# Altium PCB POD-Design-v1.0.PcbDoc (part 8 of 8)
Units mil, origin at the board's own origin, x right, y up, seen from the top; angles counter-clockwise.
Board outline 5511.81 x 3937.01 mil, 4 copper layers (Top Layer, Layer 1, Layer 2, Bottom Layer), stack 61.653 mil thick; 347 components, 252 nets, 1015 pads, 412 vias.
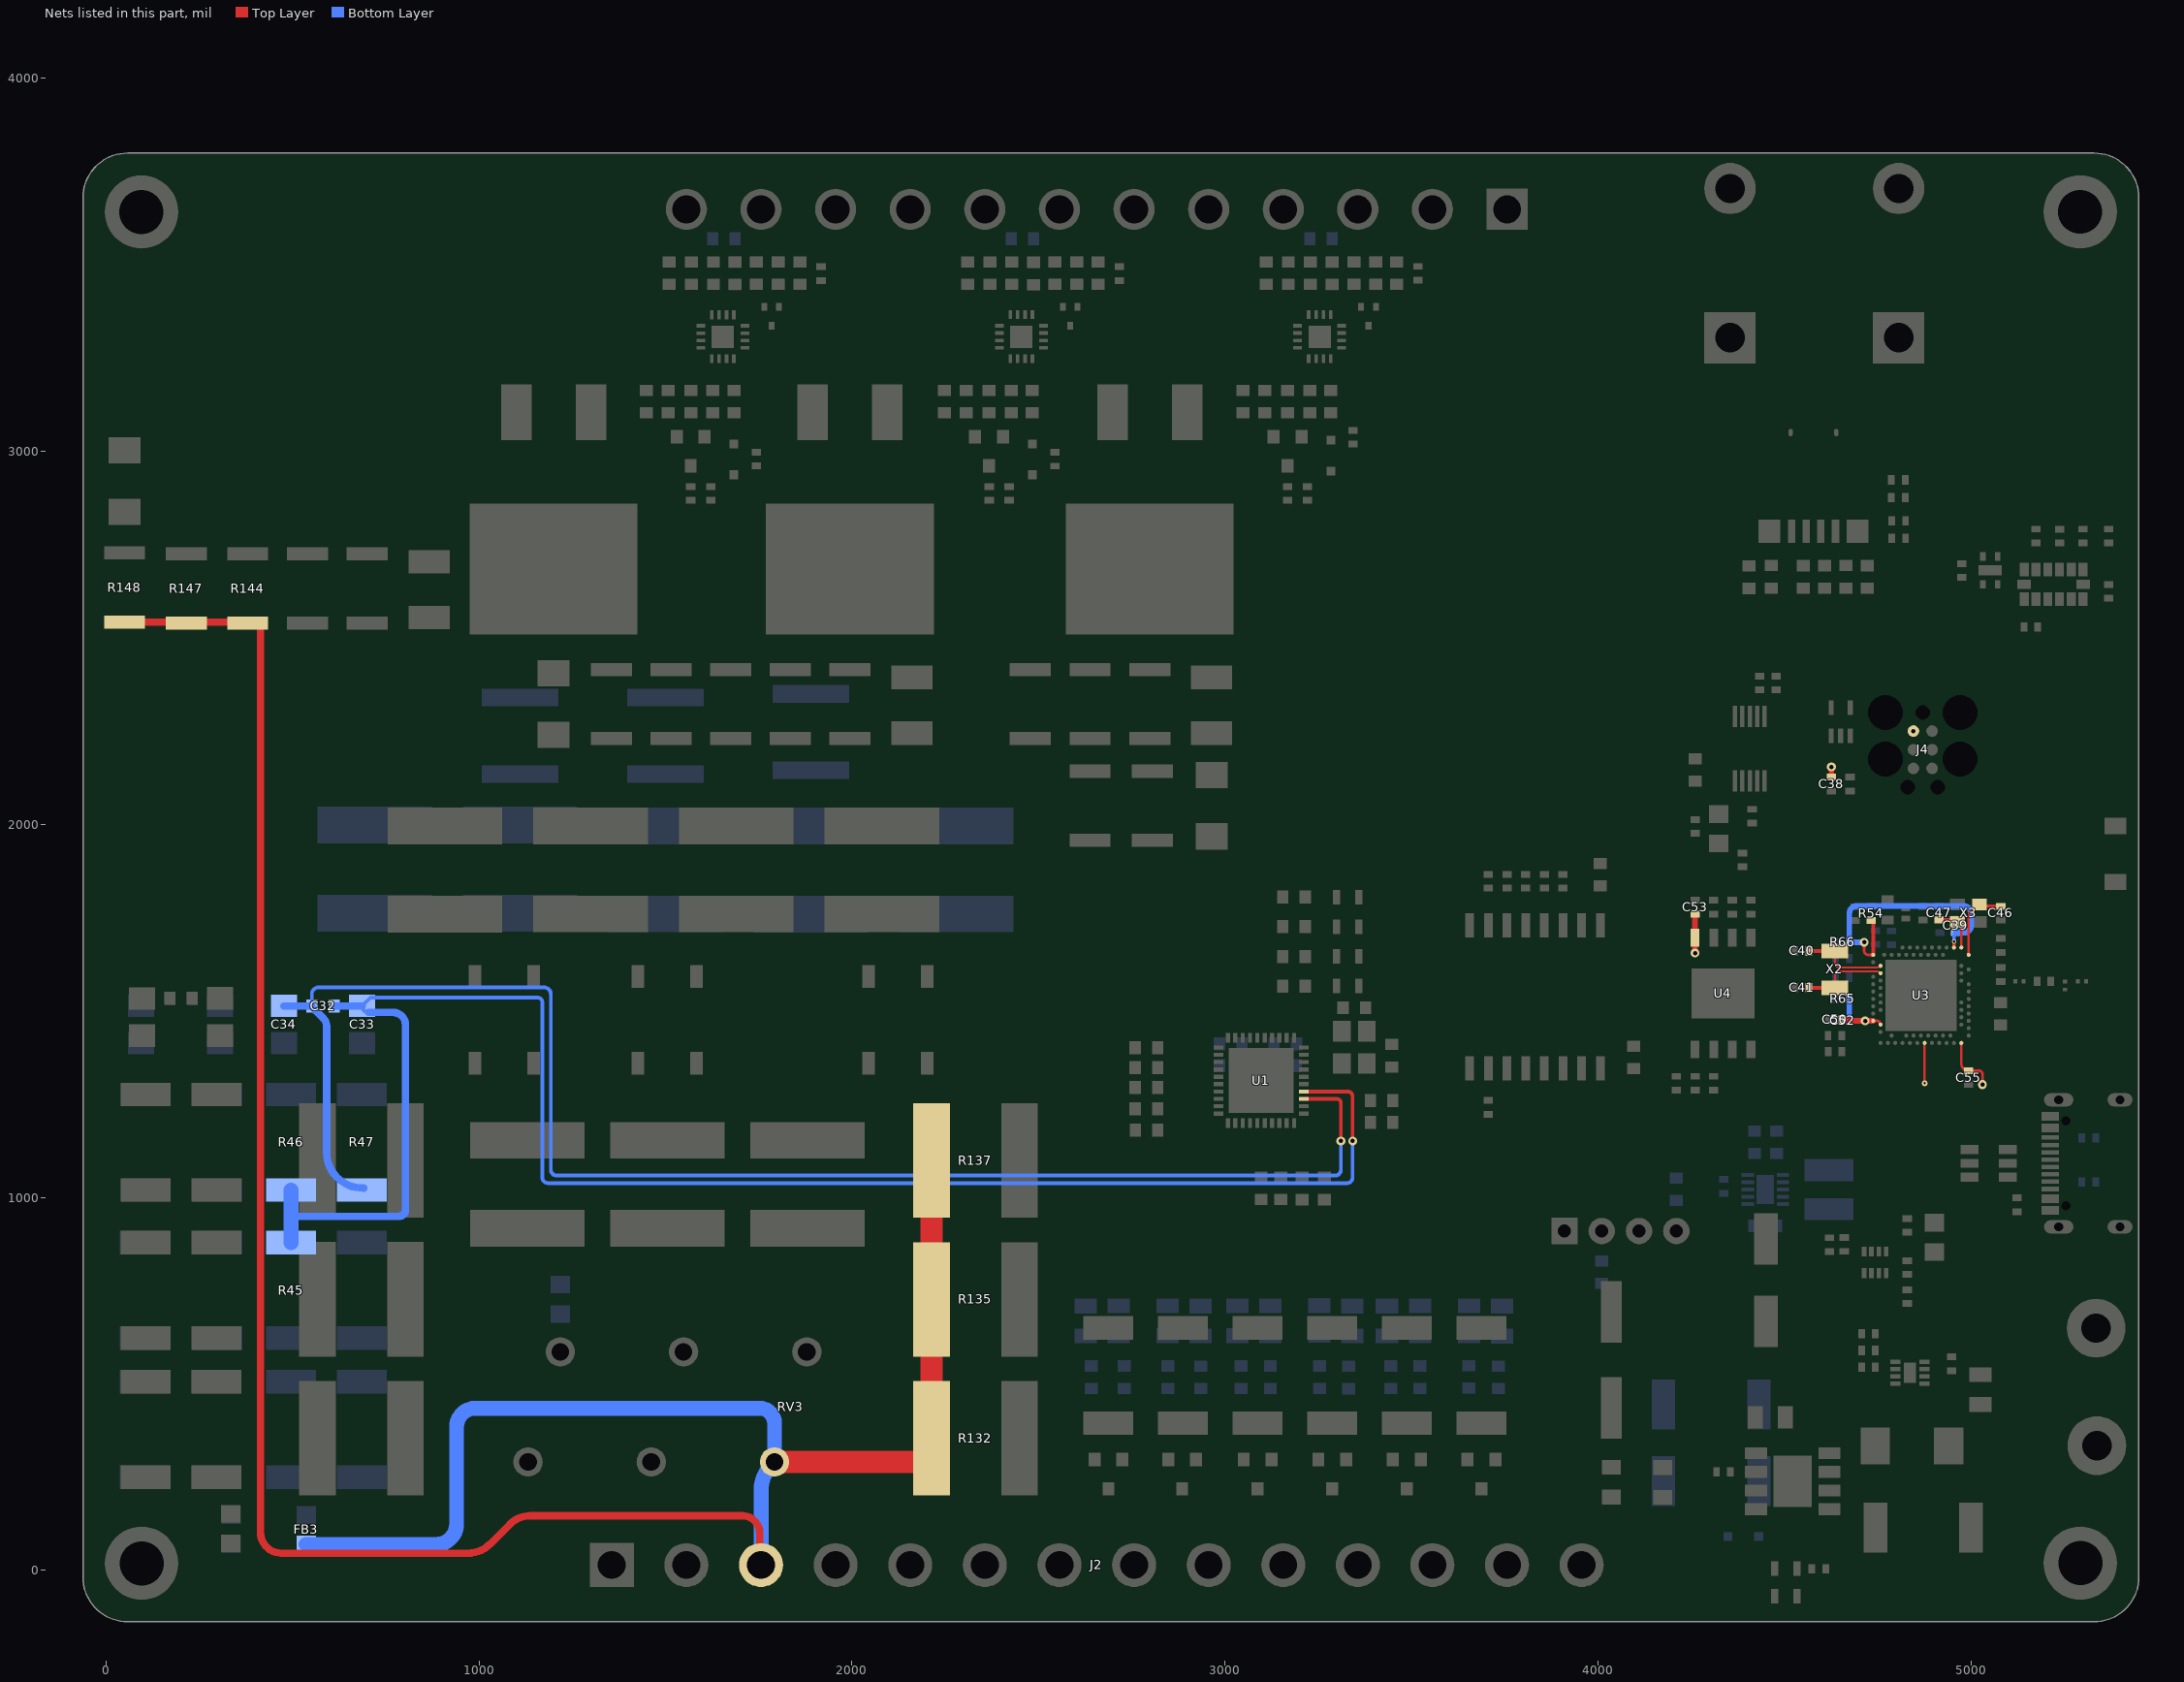
[diagram p6: the nets of this part, all layers, seen from the top]

## Via types
v1: diameter 23.62, hole 11.81, Top Layer to Bottom Layer, tented both sides, 381 vias
v2: diameter 11.81, hole 5.91, Top Layer to Bottom Layer, tented both sides, 30 vias
v3: diameter 15.75, hole 5.91, Top Layer to Bottom Layer, tented both sides, 1 vias

## Nets (pads, with @x,y where several pads share a name; then routed paths per layer and width w, separated by ;. In a path a pad name is that pad's centre, name@x,y a point inside that pad or via, vN(x,y) a via of type N, cw(c..) or ccw(c..) an arc to the next point about the centre after c; other vN are vias at no path point) (continued)
VC_INPUT: FB3.1 J2.3 R132.1 R135.1 R137.1 R144.1 R147.1 R148.1 RV3.2 | length 7535.1
  Top Layer w20: R148.1@50,2542.48 377.44,2542.48 cw(c377.44,2539.92) R144.1@380,2539.92 401.54,2539.92 414.26,2527.21 414.26,102.74 ccw(c470.53,102.74) 470.53,46.46 970.33,46.46 970.39,46.46 ccw(c970.39,130.56) 1029.86,71.09 1083.08,124.31 cw(c1137.7,69.69) 1137.7,146.93 1705.97,146.93 cw(c1705.97,100.06) 1752.84,100.06 1752.84,18.08 ccw(c1756.1,18.08) J2.3@1756.1,14.82
  Top Layer w60: RV3.2@1792.21,291 2209,291 R132.1@2220,280 ; R132.1@2194.81,310.06 ccw(c2194.81,328.14) 2212.89,328.14 R132.1@2212.89,354.39 R135.1@2212.89,726.63 R137.1@2212.89,1098.87
  Bottom Layer w40: FB3.1@536.52,70.08 885.08,70.08 ccw(c885.08,125) 940,125 940,385.08 cw(c989.53,385.08) 989.53,434.61 1752.87,434.61 cw(c1752.87,395.27) 1792.21,395.27 RV3.2@1792.21,291 1785.39,284.18 ccw(c1856.1,213.47) 1756.1,213.47 J2.3@1756.1,14.82
VC_N: C32.2 C34.2 R47.2 U1.23 | length 4220.5
  Top Layer w10: U1.23@3210.97,1264.29 3299.89,1264.29 cw(c3299.89,1253.55) 3310.63,1253.55 v1(3310.63,1151.65)
  Bottom Layer w10: C32.2@562.07,1500.82 562.07,1503.38 C32.2@552.07,1513.38 552.07,1545.39 cw(c569.84,1545.39) 569.84,1563.16 1174.17,1563.16 cw(c1174.17,1544.77) 1192.57,1544.77 1192.57,1074.43 ccw(c1207.99,1074.43) 1207.99,1059.01 3295.79,1059.01 ccw(c3295.79,1073.85) 3310.63,1073.85 v1(3310.63,1151.65) ; 582.88,1480.01 582.95,1479.93 ; 591.52,1459.16 591.52,1459.24
  Bottom Layer w20: C34.2@477.07,1513.38 C32.2@552.07,1513.38 ; C32.2@562.07,1500.82 582.88,1480.01 ; 582.95,1479.93 cw(c562.19,1459.22) 591.52,1459.24 ; 591.52,1459.16 591.52,1121.33 ccw(c687.53,1121.33) R47.2@690.77,1025.38
VC_P: C32.1 C33.2 R45.2 R46.2 U1.24 | length 4686.8
  Top Layer w10: U1.24@3210.97,1283.97 3328.7,1283.97 cw(c3328.7,1270.73) 3341.95,1270.73 v1(3341.95,1151.65)
  Bottom Layer w10: C33.2@704.57,1495.88 cw(c704.57,1513.38) C33.2@687.07,1513.38 709.48,1535.8 1156.59,1535.8 cw(c1156.59,1522.45) 1169.94,1522.45 1169.94,1053.62 ccw(c1185.07,1053.62) 1185.07,1038.49 3327.01,1038.49 ccw(c3327.01,1053.43) 3341.95,1053.43 v1(3341.95,1151.65)
  Bottom Layer w20: 496.52,949.5 786.02,949.5 ccw(c786.02,966.3) 802.82,966.3 802.82,1463.06 ccw(c770,1463.06) 770,1495.88 C33.2@704.57,1495.88 ; C32.1@612.07,1513.38 C33.2@687.07,1513.38
  Bottom Layer w40: R45.2@496.52,878.96 496.52,949.5 R46.2@496.52,1020.04
VDD-nRF: C38.2 C39.2 C50.2 C52.2 C53.2 C55.2 J4.1 R54.2 R65.1 R66.1 U3.A22 U3.AD14 U3.AD23 U3.B1 U3.W1 U3.Y2 U4.8 | length 1343.9
  Top Layer w7: C50.2@4653.5,1477.07 ccw(c4657.33,1477.07) C50.2@4657.33,1473.24 ; v1(4713.43,1684.2) 4713.43,1661.1 ccw(c4724.12,1661.1) 4724.12,1650.41 U3.B1@4737.66,1650.41 ; U3.W1@4737.76,1473.35 4747.4,1473.35 cw(c4747.4,1463.4) U3.Y2@4757.35,1463.4 ; v3(4875.46,1306.37) U3.AD14@4875.46,1414.19 ; U3.AD23@4973.88,1414.19 4973.88,1358.62 ccw(c4993,1358.62) C55.2@4993,1339.5 5021.47,1339.5 cw(c5021.47,1330) 5030.97,1330 5030.97,1302.5 v1(5030.84,1302.5)
  Top Layer w10: U3.B1@4737.66,1650.41 R54.2@4737.66,1742.82 ; U3.A22@4954.2,1670.09 v2(4954.2,1686.01)
  Top Layer w15: v1(4260,1655) U4.8@4259.99,1696.16 C53.2@4260,1759.64 ; C38.2@4625.62,2126.62 v1(4625.62,2154.25) ; C50.2@4657.33,1473.24 v1@4716.22,1473.24 ; v1(4716.22,1473.35) U3.W1@4737.56,1473.35
  Bottom Layer w7: C52.2@4673.72,1473.35 C52.2@4673.72,1473.88
  Bottom Layer w10: v2(4954.2,1686.01) C39.2@4954.2,1706.27
  Bottom Layer w15: C52.2@4673.72,1473.35 v1(4716.22,1473.35) ; C52.2@4673.72,1473.88 R65.1@4673.72,1532.3 ; v1(4713.43,1684.2) R66.1@4673.72,1684.2 4673.72,1761.42 cw(c4693.73,1761.42) 4693.73,1781.43 4980.5,1781.43 cw(c4980.5,1761.62) 5000.3,1761.62 5000.3,1728.61 cw(c4981.74,1728.61) 4981.74,1710.05 C39.2@4957.97,1710.05
  other v1: 4845.61,2250.13
XC1: C46.2 U3.B24 X3.1 | length 201.5
  Top Layer w6: U3.B24@4993.57,1650.41 4993.57,1755.21 cw(c5006.94,1755.21) 4997.11,1764.27 cw(c5006.94,1755.21) 4997.48,1764.66 5018.59,1785.75 X3.1@5022.52,1785.75
  Top Layer w10: X3.1@5027.16,1780.63 C46.2@5079.63,1780.63
XC2: C47.2 U3.A23 X3.3 | length 133.4
  Top Layer w6: X3.3@4963.47,1743.63 X3.3@4963.47,1738.5 4973.88,1738.5 U3.A23@4973.88,1670.09
  Top Layer w10: C47.2@4914,1743.63 X3.3@4963.47,1743.63
XL1: C40.2 U3.D2 X2.1 | length 231.7
  Top Layer w5: 4635,1628.32 ccw(c4646.66,1628.32) 4646.69,1616.66 4747.15,1616.66 ccw(c4747.15,1631.08) U3.D2@4757.35,1620.88 ; 4635,1628.35 X2.1@4635,1659.94
  Top Layer w10: C40.2@4565,1660.57 X2.1@4635,1660.57
XL2: C41.2 U3.F2 X2.2 | length 232.3
  Top Layer w5: X2.2@4635,1562.14 4635,1593.24 cw(c4648.13,1593.24) 4648.13,1606.37 4744.86,1606.37 cw(c4744.86,1588.71) 4754.14,1603.74 cw(c4744.86,1588.71) U3.F2@4757.35,1601.2
  Top Layer w10: C41.2@4565,1562.14 X2.2@4635,1562.14
pads on no net: ANT1.2 D8.3 J1.A8 J1.B8 J1.MH J2.5 J2.12 J4.MP1 J4.MP2 J4.MP3 J4.MP4 J4.MP5 J4.MP6 J4.MP7 U1.33 U1.34 U3.A8 U3.A10 U3.A12 U3.A14 U3.A20 U3.AB2 U3.AC9 U3.AC11 U3.AC21 U3.AD8 U3.AD10 U3.AD20 U3.B9 U3.B11 U3.B13 U3.B19 U3.J24 U3.L24 U3.P23 U3.U1 U12.3 U12.9 U12.10 U12.11

## Polygon pours and split planes (outlines as drawn)
GND on Layer 1 "NONET_L-01_P-001" (solid, pour order 0): 3605,2174 ccw(c3505,2174) 3505,2274 -61.81,2274 -61.81,2430 -61.81,3699.57 cw(c38.19,3699.57) 38.19,3799.57 5330,3799.57 cw(c5330,3679.58) 5450,3679.57 5450,-17.43 cw(c5330,-17.44) 5330,-137.43 4466.86,-137.43 4362.93,-137.45 4362.93,1479.64 ccw(c4299.84,1479.64) 4299.84,1542.73 3673.41,1542.73 cw(c3673.41,1611.14) 3605,1611.14
NGND on Layer 1 "NONET_L-01_P-001" (solid, pour order 26): 3478,1476 ccw(c3526,1476) 3526,1428 4132.69,1428 cw(c4133.7,1372.7) 4189,1373.72 4189,-137.43 188.65,-137.43 38.19,-137.43 cw(c38.19,-37.43) -61.81,-37.43 -61.81,1995 3400,1995 cw(c3400,1917) 3478,1917
GND on Top Layer "NONET_L-01_P-001" (solid, remove dead copper, pour order 43): 3677,1820 3497,1820 3497,1542.73 4299.84,1542.73 cw(c4299.84,1479.64) 4362.93,1479.64 4362.93,-137.45 4466.86,-137.43 5330,-137.43 ccw(c5330,-17.44) 5450,-17.43 5450,3679.57 ccw(c5330,3679.58) 5330,3799.57 2694.09,3799.57 975,3799.57 975,2894.42 3389.14,2894.42 ccw(c3389.14,2977.68) 3472.41,2977.68 3472.41,3357.41 cw(c3544.87,3357.41) 3544.87,3429.87 3613.13,3429.87 cw(c3613.13,3366) 3677,3366
DC_CUR_POS on Top Layer "NONET_L-01_P-001" (solid, pour order 1): 4235,3010 ccw(c4267.32,3010) 4267.32,2977.68 4510.79,2977.68 ccw(c4510.79,2995) 4528.11,2995 4528.11,3740.3 ccw(c4490.14,3740.3) 4490.14,3778.27 4273.27,3778.27 ccw(c4273.27,3740) 4235,3740
3V3 on Top Layer "NONET_L-01_P-001" (solid, pour order 16): 4381,2860.38 cw(c4393.55,2860.38) 4393.55,2872.93 4476.69,2872.93 cw(c4476.69,2860.62) 4489.01,2860.62 4489.01,2688.2 cw(c4474.03,2688.19) 4474.03,2673.22 4393.7,2673.22 cw(c4393.7,2685.92) 4381,2685.92
VBAT on Top Layer "NONET_L-01_P-001" (solid, pour order 6): 4910,470 ccw(c4910,445) 4885,445 4885,70 ccw(c4913.27,70) 4913.28,41.72 5028.14,41.72 ccw(c5028.14,73.59) 5060,73.59 5060,208.66 cw(c5086.33,208.66) 5086.34,235 5397.67,235 ccw(c5397.67,260.22) 5422.89,260.22 5422.89,447.11 ccw(c5400,447.11) 5400,470
NetR74_1 on Top Layer "NONET_L-01_P-001" (solid, pour order 4): 4590.71,230.2 4806.8,230.2 cw(c4806.8,212) 4825,212 4825,51.88 cw(c4814.84,51.88) 4814.84,41.72 4694.57,41.72 cw(c4694.57,51.29) 4685,51.29 4685,186.45 ccw(c4672.82,186.45) 4672.82,198.62 4590.71,198.62
DC_CUR_NEG on Top Layer "NONET_L-01_P-001" (solid, pour order 2): 4687,3145.35 cw(c4665,3145.35) 4665,3123.35 ccw(c4665,3095) 4636.65,3095 4636.65,3005.1 ccw(c4664.07,3005.1) 4664.07,2977.68 4841.05,2977.68 4962.79,2977.68 ccw(c4962.79,2995) 4980.11,2995 4980.11,3740.3 ccw(c4942.14,3740.3) 4942.14,3778.27 4725.27,3778.27 ccw(c4725.27,3740) 4687,3740
NGND on Layer 2 "NONET_L-01_P-001" (solid, remove dead copper, pour order 41): 626,1995 626,1892.93 ccw(c726,1892.93) 726,1792.93 2132.92,1792.93 ccw(c2132.92,1832.61) 2172.6,1832.61 2172.6,1995 2491,1995 cw(c2490,1928.73) 2556.27,1927.73 2556.27,1100.12 ccw(c2638.22,1100.12) 2638.22,1018.17 3765.27,1018.17 cw(c3765.27,947.44) 3836,947.44 3836,-137.43 3714.35,-137.43 188.65,-137.43 38.19,-137.43 cw(c38.19,-37.44) -61.81,-37.43 -61.81,1995
GND on Layer 2 "NONET_L-01_P-001" (solid, remove dead copper, pour order 40): 4362.93,1148.04 4652.04,1148.04 4652.04,500.78 4473.7,500.78 4473.7,-34.28 4289.81,-34.28 4289.81,-137.45 4362.93,-137.45 4466.86,-137.43 5330,-137.43 ccw(c5330,-17.44) 5450,-17.43 5450,3679.57 ccw(c5330,3679.58) 5330,3799.57 38.19,3799.57 ccw(c38.19,3699.57) -61.81,3699.57 -61.81,2430 -61.81,2274 3505,2274 cw(c3505,2174) 3605,2174 3605,1542.73 4299.84,1542.73 cw(c4299.84,1479.64) 4362.93,1479.64
VBUS on Layer 2 "NONET_L-01_P-001" (solid, pour order 29): 4453.31,480.39 4289.81,480.39 4289.81,6.08 ccw(c4331.14,7.15) 4332.21,-34.17 5050.67,-34.17 ccw(c5050.67,21.16) 5106,21.16 5106,863.91 ccw(c5065.91,863.91) 5065.91,904 4795,904 ccw(c4795,868.15) 4759.15,868.15 4759.15,754.85 ccw(c4788,754.85) 4788,726 4869,726 cw(c4869,705.15) 4889.85,705.15 4889.85,212.86 cw(c4828.98,212.86) 4828.98,152 4489.24,152 cw(c4489.09,187.78) 4453.31,187.85
3V3 on Layer 2 "NONET_L-01_P-001" (solid, pour order 25): 4602.35,1127.65 cw(c4602.35,1084) 4646,1084 4646,628.73 ccw(c4663.23,628.73) 4663.23,611.5 4724.36,611.5 cw(c4724.36,592.49) 4743.38,592.49 4743.38,522.11 cw(c4722.05,522.11) 4722.04,500.78 3991.91,500.78 cw(c3991.91,527.25) 3965.43,527.25 3965.43,935.05 cw(c3993.38,935.05) 3993.38,963 4034.65,963 cw(c4034.65,944.1) 4053.55,944.1 4053.55,834.51 ccw(c4074.57,834.51) 4074.57,813.48 4327.48,813.48 ccw(c4327.48,831) 4345,831 4345,1105.55 cw(c4367.1,1105.55) 4367.1,1127.65
3V3-IS on Layer 2 "NONET_L-01_P-001" (solid, pour order 23): 2715,1740 ccw(c2715,1695) 2670,1695 2670,1165.17 ccw(c2724.17,1165.17) 2724.17,1111 4143.93,1111 cw(c4143.93,1080.36) 4174.57,1080.36 4174.57,869.78 ccw(c4195.43,869.78) 4195.43,848.92 4301.09,848.92 ccw(c4301.09,867.83) 4320,867.83 4320,1349.04 ccw(c4285.09,1349.04) 4285.09,1383.95 3140.66,1383.95 cw(c3140.66,1411.9) 3112.71,1411.9 3112.71,1476.31 cw(c3135.95,1476.31) 3135.95,1499.55 3162.76,1499.55 ccw(c3162.76,1521.99) 3185.19,1521.99 3185.19,1700 ccw(c3145.19,1700) 3145.19,1740
VDD-nRF on Layer 2 "NONET_L-01_P-001" (solid, remove dead copper, pour order 22): 4656.01,1634.87 cw(c4656.01,1604.66) 4686.22,1604.66 4686.22,1333.66 ccw(c4731.74,1333.66) 4731.74,1288.14 4914.83,1290 5060,1290 ccw(c5060,1327.46) 5097.46,1327.46 5097.46,2399.93 ccw(c5052.39,2399.93) 5052.39,2445 4160,2445 ccw(c4160,2380) 4095,2380 4095,1687.87 ccw(c4148,1687.87) 4148,1634.87
VBUS-TYPEC on Layer 2 "NONET_L-01_P-001" (solid, pour order 21): 5159.95,1246 cw(c5160.04,1217.17) 5188.87,1217.17 5188.87,961.43 cw(c5161.2,961.43) 5161.2,933.76 4884.24,933.76 cw(c4884.24,952) 4866,952 4866,1224 cw(c4888,1224) 4888,1246
GND on Bottom Layer "NONET_L-01_P-001" (solid, remove dead copper, pour order 42): 3001.47,3272 cw(c3001.47,3172) 3101.47,3172 3101.47,2891 3605,2891 3605,1611.14 ccw(c3673.41,1611.14) 3673.41,1542.73 4299.84,1542.73 cw(c4299.84,1479.64) 4362.93,1479.64 4362.93,-137.45 4466.86,-137.43 5330,-137.43 ccw(c5330,-17.44) 5450,-17.43 5450,3679.57 ccw(c5330,3679.58) 5330,3799.57 2684.09,3799.57 1180,3799.57 1180,3272
NetC91_2 on Bottom Layer "NONET_L-01_P-001" (solid, pour order 34): 1346.46,2135.46 cw(c1383,2135.46) 1383,2172 1613,2172 cw(c1613,2131.46) 1653.54,2131.46 1653.54,1946.17 cw(c1622,1946.17) 1622,1914.63 1378.83,1914.63 cw(c1378.83,1947.01) 1346.46,1947.01
GND on Bottom Layer "NONET_L-01_P-001" (solid, pour order 31): 4175.57,307 4284.22,307 cw(c4284.22,291.22) 4300,291.22 4300,130.25 ccw(c4310.25,130.25) 4310.25,120 4368.51,120 cw(c4368.51,103.03) 4385.47,103.03 4385.47,71.53 ccw(c4412,71.53) 4412,45 4461,45 ccw(c4461,62) 4478,62 4478,303 cw(c4499,303) 4499,324 4574.53,324 cw(c4574.53,298.62) 4599.91,298.62 4599.91,21.78 cw(c4567.12,21.78) 4567.12,-11 4136,-11 cw(c4136,6) 4119,6 4119,287.3 cw(c4138.69,287.3) 4138.7,307
VBAT on Bottom Layer "NONET_L-01_P-001" (solid, pour order 27): 4723.86,1006.85 ccw(c4723.86,991.78) 4708.79,991.78 4708.79,542.9 ccw(c4728.54,542.9) 4728.54,523.15 5064.35,523.15 cw(c5064.35,495.5) 5092,495.5 5092,257.11 ccw(c5127.77,257.11) 5127.77,221.34 5402.36,221.34 ccw(c5402.36,251.39) 5432.4,251.39 5432.4,465.1 ccw(c5400,465.1) 5400,497.5 5261,497.5 cw(c5261,529) 5229.5,529 5229.5,725.5 ccw(c5208.5,725.5) 5208.5,746.5 5007.5,746.5 4806.5,746.5 cw(c4806.5,765) 4788,765 4788,990.5 ccw(c4771.65,990.5) 4771.65,1006.85
3V3 on Bottom Layer "NONET_L-01_P-001" (solid, pour order 24): 5338.21,2870 cw(c5338.21,2852.28) 5355.93,2852.28 5355.93,2600.6 cw(c5336.4,2600.6) 5336.4,2581.07 4526.03,2581.07 ccw(c4526.03,2535.04) 4480,2535.04 4480,2123.54 cw(c4446.46,2123.54) 4446.46,2090 4088,2090 ccw(c4087.99,2056.02) 4054.01,2056.01 4054.01,830 cw(c4030.15,830) 4030.15,806.14 3990.51,806.14 cw(c3990.51,831.21) 3965.43,831.22 3965.43,1774.57 ccw(c3914.01,1774.57) 3914.01,1825.99 3100,1825.99 3100,2870

## Other copper
Top Layer:
  rectangle net GND: 4814.42,2794.43 4867.18,2900.92
  rectangle net 3V3-IS: 4005.93,1332.5 4095,1357.51
  rectangle net VBUS: 4345.64,298.62 4453.31,330.2
  rectangle net GND: 4522.01,248.62 4649.96,280.2
  rectangle net NetR74_1: 4590.71,198.62 4743.38,230.2
  rectangle net NetL7_1: 4590.71,298.62 4686.37,330.2
  rectangle net DC_CUR_POS: 4427.15,3034.77 4528.11,3178.7
  rectangle net GND: 1619.57,3272.59 1688.46,3341.48
  rectangle net GND: 2419.57,3272.59 2488.46,3341.48
  rectangle net GND: 3219.57,3272.59 3288.46,3341.48
  pour cut-out: 4828.39,2150.13 ccw(c4845.61,2150.13) 4845.61,2132.91 ccw(c4845.61,2150.13) 4862.84,2150.13 ccw(c4845.61,2150.13) 4845.61,2167.35 ccw(c4845.61,2150.13)
  pour cut-out: 4811.61,984 ccw(c4828.83,984) 4828.83,966.78 ccw(c4828.83,984) 4846.05,984 ccw(c4828.83,984) 4828.83,1001.22 ccw(c4828.83,984)
  pour cut-out: 5140.78,1218.5 ccw(c5158,1218.5) 5158,1201.27 ccw(c5158,1218.5) 5175.22,1218.5 ccw(c5158,1218.5) 5158,1235.72 ccw(c5158,1218.5)
  pour cut-out: 4658.78,545.15 ccw(c4676,545.15) 4676,527.93 ccw(c4676,545.15) 4693.22,545.15 ccw(c4676,545.15) 4676,562.37 ccw(c4676,545.15)
  region net VBAT: 4957.73,546.05 cw(c4957.72,536.27) 4967.5,536.26 4967.5,478.65 ccw(c4976.3,478.65) 4976.3,469.85 4990.15,469.85 cw(c4990.15,465) 4995,465 4995,449.5 cw(c4990.5,449.5) 4990.5,445 4885,445 4885,458.11 cw(c4897.28,458.12) 4897.28,470.39 4924.39,470.39 ccw(c4924.39,477.05) 4931.06,477.06 4931.06,494.16 4931.06,508.67 ccw(c4925.17,508.68) 4925.17,514.56 4861.22,514.56 4861.22,546.05
  region net 3V3: 4331.8,1972.44 4384.4,1972.44 ccw(c4384.4,1980.96) 4392.93,1980.96 4392.93,2005.09 cw(c4400.52,2005.09) 4400.52,2012.69 4720.56,2012.69 cw(c4720.56,1989.09) 4744.16,1989.09 4744.16,1770.82 4719.16,1770.82 4719.16,1973.17 ccw(c4707.14,1973.17) 4707.14,1985.19 4434.49,1985.19 ccw(c4434.49,1977.09) 4426.39,1977.09 4426.39,1928.78 cw(c4412.61,1928.78) 4412.61,1915 4139.56,1915 ccw(c4139.56,1895.44) 4120,1895.44 4120,1716.16 cw(c4100,1716.16) 4100,1696.16 3994.85,1696.16 cw(c3994.85,1696.89) 3994.12,1696.89 cw(c3994.12,1706.08) 3984.93,1706.08 3984.93,1847.42 cw(c4002.95,1847.42) 4002.95,1865.44 4055.25,1865.44 ccw(c4055.25,1880.44) 4070.25,1880.44 4070.25,1919.97 cw(c4090.28,1919.97) 4090.28,1940 4280.01,1940 ccw(c4279.68,1946.01) 4285.68,1946.34 4285.68,1965.64 cw(c4292.48,1965.64) 4292.48,1972.44
  region net VB_INPUT: 1415,398.28 ccw(c1448.28,398.28) 1448.28,365 1519.02,365 cw(c1519.7,329.7) 1555,330.37 1555,280 cw(c1520,280) 1520,245 1340.47,245 cw(c1340.47,256.9) 1328.57,256.9 1328.57,812 ccw(c1302.87,812) 1302.87,837.7 1006.47,837.7 cw(c1006.47,867.73) 976.44,867.73 976.44,971.26 cw(c1005.29,971.26) 1005.29,1000.11 1999.9,1000.11 cw(c1999.9,966.16) 2033.86,966.16 2033.86,867 cw(c2004.69,867) 2004.69,837.83 1445.69,837.83 ccw(c1445.69,807.14) 1415,807.14
  region net NetBR2_4: 1715,1250.04 ccw(c1738.63,1250.04) 1738.63,1226.41 2003.82,1226.41 cw(c2003.82,1196.38) 2033.86,1196.38 2033.86,1092.86 cw(c2005,1092.86) 2005,1064 1010.39,1064 cw(c1010.39,1097.95) 976.44,1097.95 976.44,1197.11 cw(c1005.61,1197.11) 1005.61,1226.28 1532.28,1226.28 ccw(c1532.28,1254) 1560,1254 1560,1387.21 cw(c1586.79,1387.21) 1586.79,1414 1690.17,1414 cw(c1690.17,1389.18) 1715,1389.17
  region net NEUTRAL: 1115,1397.39 cw(c1137.61,1397.39) 1137.61,1420 1434.93,1420 cw(c1434.93,1394.93) 1460,1394.93 1460,1344.75 cw(c1435.26,1344.74) 1435.25,1320 1139.11,1320 cw(c1139.11,1344.11) 1115,1344.11
  region net NetC91_2: 1838.99,2095.33 cw(c1838.99,2061.5) 1872.82,2061.5 1872.82,1947.01 1453.37,1947.01 1145.67,1947.01 1145.67,2063.33 cw(c1177.67,2063.33) 1177.67,2095.33
  region net NetC100_2: 2234.15,1947.01 1926.46,1947.01 1926.46,2063.33 cw(c1958.46,2063.33) 1958.46,2095.33 2206,2095.33 cw(c2206,2067.18) 2234.15,2067.18
  region net NetC82_2: 1062.97,1946.73 755.28,1946.73 755.28,2063.05 cw(c787.28,2063.05) 787.28,2095.05 1034.82,2095.05 cw(c1034.82,2066.9) 1062.97,2066.9
  region net NetBR2_1: 1838.99,1859.11 cw(c1838.99,1825.28) 1872.82,1825.28 1872.82,1710.79 1453.37,1710.79 1145.67,1710.79 1145.67,1827.11 cw(c1177.67,1827.11) 1177.67,1859.11
  region net NetBR3_1: 2234.15,1710.79 1926.46,1710.79 1926.46,1827.11 cw(c1958.46,1827.11) 1958.46,1859.11 2206,1859.11 cw(c2206,1830.96) 2234.15,1830.96
  region net NetBR1_1: 1062.97,1710.51 755.28,1710.51 755.28,1826.83 cw(c787.28,1826.83) 787.28,1858.83 1034.82,1858.83 cw(c1034.82,1830.68) 1062.97,1830.68
  region net NetC82_2: 3116.56,3292.39 cw(c3116.56,3299.89) 3109.05,3299.89 3109.05,3316.22 cw(c3114.75,3316.22) 3114.75,3321.92 3160.37,3321.92 3207.11,3321.92 3207.11,3292.39
  region net NetC91_2: 2316.56,3292.39 cw(c2316.56,3299.89) 2309.05,3299.89 2309.05,3316.22 cw(c2314.75,3316.22) 2314.75,3321.92 2360.37,3321.92 2407.11,3321.92 2407.11,3292.39
  region net GND: 4408.42,813.05 4408.42,1049.37 cw(c4423.44,1049.37) 4423.44,1064.39 4495.07,1064.39 cw(c4495.07,1048.47) 4510.99,1048.47 4510.99,811.28 cw(c4497.01,811.28) 4497.01,797.3 4424.17,797.3 cw(c4424.17,813.05)
  region net VBAT: 4759.15,841.98 4759.15,940.14 ccw(c4746.55,940.14) 4746.55,952.74 4705.74,952.74 ccw(c4705.74,941) 4694,941 4694,897.59 ccw(c4707.18,897.59) 4707.18,884.41 4734.47,884.41 cw(c4734.47,872.34) 4746.55,872.34 4746.55,841.98
  region net V-OR: 4726.87,868.36 4726.87,764.22 cw(c4715.38,764.22) 4715.38,752.74 4434.44,752.74 ccw(c4434.44,736.72) 4418.42,736.72 4418.42,596.58 ccw(c4434,596.58) 4434,581 4535.08,581 ccw(c4535.08,598.92) 4553,598.92 4553,669.09 cw(c4569.91,669.09) 4569.91,686 4725,686 ccw(c4725,700.46) 4739.46,700.46 4739.46,868.36
  region net VBUS: 4746.55,827.05 cw(c4752.95,827.05) 4752.95,833.45 4760.83,833.45 ccw(c4760.83,838.85) 4766.24,838.85 4766.24,907.13 cw(c4775.27,907.13) 4775.27,916.17 4843.53,916.16 cw(c4843.53,907.29) 4852.41,907.29 4852.41,884.57 ccw(c4859.72,884.57) 4859.73,877.25 4979.75,877.25 cw(c4979.75,870) 4987,870 4987,825.15 cw(c4979.87,825.15) 4979.87,818.02 4764.13,818.02 ccw(c4764.13,813.04) 4759.15,813.04 4759.15,784.11 4746.55,784.11
  region net VBUS: 4590.71,-16.68 ccw(c4604.03,-16.68) 4604.03,-30 4634.65,-30 ccw(c4634.65,-14.69) 4649.96,-14.69 4649.96,180.2 4590.71,180.2
  region net VBUS-TYPEC: 4987,898.34 cw(c4976.13,898.34) 4976.13,887.47 4873.31,887.47 cw(c4873.31,896.78) 4864,896.78 4864,959.88 4864,999 cw(c4876.81,999) 4876.81,1011.81 4976.19,1011.81 cw(c4976.19,1001) 4987,1001
  region net VBUS-TYPEC: 5137.44,1189.81 cw(c5145.44,1189.81) 5145.44,1197.8 5212.5,1197.8 5212.5,1174.18 5188.87,1174.18 5186.96,1173.99 5183.43,1172.53 5180.73,1169.83 5179.27,1166.3 5179.08,1164.39 5179.08,1141.52 5179.08,1140.18 5178.06,1137.72 5176.17,1135.83 5173.71,1134.81 5172.37,1134.81 5145.4,1134.81 5143.82,1134.81 5140.89,1136.02 5138.65,1138.26 5137.44,1141.19 5137.44,1142.77
  region net NetC72_1: 3997.19,518.18 4118.02,518.19 cw(c4118.02,502.59) 4133.61,502.59 4133.61,275.46 cw(c4115,275.46) 4115,256.85 3996.15,256.85 cw(c3996.15,272) 3981,272 3981,502 cw(c3997.18,502)
  region net NetC69_2: 4363.04,2003.93 4238.06,2003.93 cw(c4238.06,2013) 4229,2013 4229,2132.63 cw(c4241.06,2132.63) 4241.06,2144.68 4373.24,2144.68 4373.24,2014.14 cw(c4363.04,2014.13)
  region net NetL1_1: 4760.65,1810.56 4760.65,1776.4 ccw(c4770.14,1776.4) 4770.14,1766.91 4836.9,1766.91 ccw(c4836.9,1773.09) 4843.09,1773.09 4843.09,1813 ccw(c4836.09,1813) 4836.09,1820 4770.09,1820 ccw(c4770.09,1810.56)
  region net NetC100_2: 1516.14,3292.27 cw(c1516.14,3299.77) 1508.63,3299.77 1508.63,3316.1 cw(c1514.33,3316.1) 1514.33,3321.8 1559.95,3321.8 1606.69,3321.8 1606.69,3292.27
  pour cut-out: 5027.73,1021.9 5027.73,1040.36 5068.73,1040.36 5068.73,1021.9
  region net GND: 4588.13,826.55 4719.78,826.55 4719.78,773.13 4588.13,773.13
  region net GND: 4888.78,506.68 4851.77,506.68 4851.77,553.93 4888.78,553.93 4888.78,563.5 4980.86,563.5 4980.86,490.39 5016.26,490.39 5016.26,647.5 4820.28,647.5 4820.28,457.25 4863.56,457.25 4863.56,489.23 4888.78,489.23
  region net VBUS: 4448.41,438.69 4451.59,435.51 4453.31,431.36 4453.31,429.11 4453.31,298.62 4314.13,298.62 4307.65,301.31 4302.69,306.27 4300,312.75 4300,316.26 4300,425 4300,428.07 4302.35,433.73 4306.68,438.06 4312.34,440.41 4444.26,440.41
  region net NEUTRAL: 2108.98,1420 2111.51,1420 2116.18,1418.06 2119.76,1414.49 2120.86,1411.83 2121.69,1407.29 2121.69,1407.28 2121.69,1314.74 2121.69,1311.81 2119.45,1306.39 2115.3,1302.24 2111.65,1300.73 2106.95,1300 2009.02,1300 2004.43,1301.9 2000.92,1305.42 1999.01,1310.01 1999.01,1312.5 1999.01,1407.67 2001.36,1413.33 2005.69,1417.66 2011.34,1420 2014.4,1420
  region net NetL7_1: 4812.29,402 4813.54,402 4815.99,401.51 4818.31,400.55 4820.39,399.16 4822.16,397.39 4823.55,395.31 4823.8,394.72 4825,389.29 4825,389.28 4825,259.55 4825,258.66 4824.66,256.93 4823.98,255.3 4823,253.84 4821.75,252.59 4821.33,252.31 4816.04,250.59 4746.66,250.59 4704.76,250.59 4703.91,250.59 4702.24,250.92 4700.66,251.58 4699.25,252.53 4698.04,253.74 4697.1,255.16 4696.46,256.74 4696.13,258.42 4696.14,259.27 4696.14,288.86 4696.09,289.81 4695.72,291.69 4694.99,293.46 4693.92,295.05 4692.57,296.41 4690.98,297.47 4689.21,298.2 4687.33,298.57 4686.38,298.62 4686.37,298.62 4669.96,298.62 4669.96,300.2 4650.94,300.2 4649.96,300.29 4593.44,300.29 4593.44,328.35 4590.71,328.35 4590.71,391.18 4590.71,392.25 4591.12,394.34 4591.94,396.31 4593.12,398.08 4594.63,399.58 4596.4,400.77 4598.37,401.58 4600.46,402 4601.53,402
  region net GND: 3932,968 3934.98,968 3940.5,965.72 3944.72,961.5 3946.34,957.58 3947,953 3947,846 3947.13,843.39 3948.15,838.28 3950.14,833.46 3953.04,829.12 3956.73,825.43 3961.06,822.53 3965.88,820.54 3971,819.52 3973.61,819.39 4322.52,819.39 4327.48,818.41 4332.14,816.47 4336.34,813.67 4339.92,810.1 4342.72,805.9 4344.66,801.23 4345.64,796.27 4345.64,793.75 4345.64,507.24 4346.06,502.95 4349.35,495.02 4355.42,488.94 4363.35,485.66 4367.65,485.24 4553.65,485.24 4557.57,485.26 4564.82,482.29 4570.39,476.78 4573.1,470.33 4573.44,465.64 4573.44,170.54 4573.44,157.7 4570.16,149.77 4564.09,143.69 4556.16,140.41 4551.86,140.41 4488.78,140.41 4485.16,140.41 4478.47,143.18 4473.34,148.31 4470.57,155 4470.57,158.62 4470.57,433.64 4470.1,438.21 4466.57,446.65 4460.07,453.1 4451.81,456.48 4451.6,456.57 4447.02,457 4222,457 4217.99,457 4210.57,460.07 4204.89,465.75 4201.82,473.17 4201.82,477.18 4201.82,582.76 4201.69,585.44 4200.64,590.7 4198.59,595.65 4195.62,600.1 4191.83,603.89 4187.37,606.86 4182.42,608.91 4177.17,609.96 4174.49,610.09 3869.05,610.09 3865.4,610.09 3858.24,611.52 3851.5,614.31 3845.43,618.36 3840.27,623.52 3836.22,629.59 3833.42,636.33 3832,643.49 3832,647.14 3832,945.43 3832,949.92 3835.44,958.22 3841.78,964.56 3850.08,968 3854.57,968
  region net VBUS-TYPEC: 5172.37,1048.2 5173.71,1048.2 5176.17,1047.18 5178.06,1045.29 5179.08,1042.83 5179.08,1041.49 5179.08,1018.62 5179.27,1016.71 5180.73,1013.18 5183.43,1010.48 5186.96,1009.01 5188.87,1008.83 5212.5,1008.83 5212.5,985.2 5115.31,985.2 5114.27,985.2 5112.35,986 5110.88,987.47 5110.09,989.39 5110.09,990.42 5110.09,1011.81 5110.09,1013.25 5111.2,1015.92 5113.24,1017.97 5115.91,1019.07 5117.35,1019.07 5129.87,1019.07 5131.35,1019.22 5134.08,1020.35 5136.17,1022.44 5137.3,1025.16 5137.44,1026.64 5137.44,1040.24 5137.44,1041.82 5138.65,1044.75 5140.89,1046.98 5143.82,1048.2 5145.4,1048.2
  region net DC_OCD2: 4795.42,2863.66 4661.37,2863.66 4658.47,2863.38 4653.1,2861.16 4649,2857.05 4646.78,2851.69 4646.49,2848.79 4646.49,2754.1 4626.81,2754.1 4626.81,2918.06 4626.81,2921.66 4629.56,2928.31 4634.65,2933.4 4641.3,2936.15 4795.42,2936.15
  region net DC_OCD1: 4792.39,2837.95 4795.46,2834.88 4797.12,2830.87 4797.12,2828.7 4797.12,2757.75 4797.12,2755.33 4795.27,2750.86 4791.85,2747.43 4787.37,2745.58 4672.4,2745.58 4668.17,2747.33 4664.93,2750.58 4663.49,2754.04 4663.49,2829.93 4665.16,2833.95 4668.83,2837.62 4673.63,2839.61 4788.38,2839.61
Layer 1:
  pour cut-out: 3961.82,1285 ccw(c4005.93,1285) 4005.93,1240.88 ccw(c4005.93,1285) 4050.05,1285 ccw(c4005.93,1285) 4005.93,1329.12 ccw(c4005.93,1285)
  pour cut-out: 3661.82,1195 ccw(c3705.93,1195) 3705.93,1150.88 ccw(c3705.93,1195) 3750.05,1195 ccw(c3705.93,1195) 3705.93,1239.12 ccw(c3705.93,1195)
  pour cut-out: 3213.13,1344.2 ccw(c3257.25,1344.2) 3257.25,1300.08 ccw(c3257.25,1344.2) 3301.37,1344.2 ccw(c3257.25,1344.2) 3257.25,1388.32 ccw(c3257.25,1344.2)
  pour cut-out: 3111.07,1679.19 ccw(c3155.19,1679.19) 3155.19,1635.07 ccw(c3155.19,1679.19) 3199.31,1679.19 ccw(c3155.19,1679.19) 3155.19,1723.31 ccw(c3155.19,1679.19)
  pour cut-out: 2937.91,1465.59 ccw(c2982.03,1465.59) 2982.03,1421.47 ccw(c2982.03,1465.59) 3026.14,1465.59 ccw(c2982.03,1465.59) 2982.03,1509.7 ccw(c2982.03,1465.59)
  pour cut-out: 2670.23,1180 ccw(c2714.35,1180) 2714.35,1135.88 ccw(c2714.35,1180) 2758.47,1180 ccw(c2714.35,1180) 2714.35,1224.12 ccw(c2714.35,1180)
  pour cut-out: 3815,815 3815,1005 4000.16,1005 4000.16,815
Layer 2:
  pour cut-out: 4503.4,2845 ccw(c4520.63,2845) 4520.63,2827.78 ccw(c4520.63,2845) 4537.85,2845 ccw(c4520.63,2845) 4520.63,2862.22 ccw(c4520.63,2845)
  pour cut-out: 5156.79,2848.94 ccw(c5174.02,2848.94) 5174.02,2831.71 ccw(c5174.02,2848.94) 5191.24,2848.94 ccw(c5174.02,2848.94) 5174.02,2866.16 ccw(c5174.02,2848.94)
  pour cut-out: 5159.77,1616.16 ccw(c5176.99,1616.16) 5176.99,1598.94 ccw(c5176.99,1616.16) 5194.21,1616.16 ccw(c5176.99,1616.16) 5176.99,1633.38 ccw(c5176.99,1616.16)
  pour cut-out: 5159.77,1694.01 ccw(c5176.99,1694.01) 5176.99,1676.78 ccw(c5176.99,1694.01) 5194.21,1694.01 ccw(c5176.99,1694.01) 5176.99,1711.23 ccw(c5176.99,1694.01)
  pour cut-out: 4936.97,1686.01 ccw(c4954.2,1686.01) 4954.2,1668.78 ccw(c4954.2,1686.01) 4971.42,1686.01 ccw(c4954.2,1686.01) 4954.2,1703.23 ccw(c4954.2,1686.01)
  pour cut-out: 5159.77,1428.46 ccw(c5176.99,1428.46) 5176.99,1411.24 ccw(c5176.99,1428.46) 5194.21,1428.46 ccw(c5176.99,1428.46) 5176.99,1445.68 ccw(c5176.99,1428.46)
  region net NetC82_2: 934.19,2193.64 934.19,2160.73 ccw(c959.63,2160.73) 959.63,2135.3 1003.15,2135.3 cw(c1003.15,2117.89) 1020.56,2117.89 1020.56,2070 cw(c1004.19,2070) 1004.19,2053.64 930.89,2053.64 cw(c930.89,2080.28) 904.24,2080.28 904.24,2180.21 cw(c919.09,2180.21) 919.09,2195.05 932.78,2195.05 cw(c932.78,2193.64)
  region net NetC100_2: 1942.61,2091.12 cw(c1959.14,2091.12) 1959.14,2107.66 2004.68,2107.66 cw(c2004.68,2088.08) 2024.26,2088.08 2024.26,1983.35 2024.26,1946.69 cw(c1997.62,1946.69) 1997.62,1920.05 1897.7,1920.05 cw(c1897.7,1934.9) 1882.85,1934.9 1882.85,1948.59 cw(c1884.26,1948.59) 1884.26,1950 1917.17,1950 ccw(c1917.17,1975.43) 1942.61,1975.43
  region net NetC91_2: 1380,2020 1412.91,2020 ccw(c1412.91,2045.43) 1438.34,2045.43 1438.34,2084.2 cw(c1460.51,2084.2) 1460.51,2106.36 1503.64,2106.36 cw(c1503.64,2090) 1520,2090 1520,2016.69 cw(c1493.36,2016.69) 1493.36,1990.05 1393.43,1990.05 cw(c1393.43,2004.9) 1378.59,2004.9 1378.59,2018.59 cw(c1380,2018.59)
  pour cut-out: 3326,2935 3319.5,2935 3319.5,2977.68 3326,2977.68
Bottom Layer:
  region net NEUTRAL: 1957.78,711.22 cw(c1957.78,635) 2034,635 2034,-22 cw(c1991,-22) 1991,-65 1915,-65 cw(c1915,-29) 1879,-29 1879,479 ccw(c1837,479) 1837,521 1121.36,521 cw(c1121.36,558.36) 1084,558.36 1084,666 cw(c1129.22,666) 1129.22,711.22 1140,711.22
  region net NGND: 1104,741 1259,741 ccw(c1259,759) 1277,759 1277,836 ccw(c1261,836) 1261,852 1101,852 ccw(c1101,835) 1084,835 1084,761 ccw(c1104,761)
  region net GND: 1429.66,1680 1366.85,1680 ccw(c1366.85,1659) 1345.85,1659 1345.85,1521.76 ccw(c1370.6,1521.76) 1370.6,1497 2675.74,1497 ccw(c2675.74,1534.26) 2713,1534.26 2713,2479.53 ccw(c2668.54,2479.54) 2668.53,2524 1545.02,2524 ccw(c1545.02,2501.98) 1523,2501.98 1523,2422.97 cw(c1492.03,2422.97) 1492.03,2392 1000,2392 ccw(c1000,2362) 970,2362 970,2316 ccw(c998,2316) 998,2288 2544,2288 cw(c2544.01,2247.01) 2585,2247 2585,1605 cw(c2546,1605) 2546,1566 2119.13,1566 cw(c2119.13,1585.13) 2100,1585.13 2100,1652.99 ccw(c2077.99,1652.99) 2077.99,1675 1980,1675 ccw(c1980,1655) 1960,1655 1960,1584.55 cw(c1943.45,1584.55) 1943.45,1568 1500.07,1568 cw(c1500.07,1585.07) 1483,1585.07 1483,1658.27 ccw(c1461.28,1658.28) 1461.27,1680
  region net NEUTRAL: 1519.04,1292.79 2105.03,1292.79 ccw(c2105.03,1317.43) 2129.67,1317.43 2129.67,1408.01 ccw(c2096.57,1408.01) 2096.57,1441.11 1502.32,1441.11 1378.55,1441.11 ccw(c1378.54,1412.96) 1350.39,1412.96 1350.39,1322.39 ccw(c1380,1322.39) 1380,1292.79
  region net NetBR3_1: 2429.17,1858.83 cw(c2429.17,1825) 2463,1825 2463,1710.51 2043.54,1710.51 1735.85,1710.51 1735.85,1826.83 cw(c1767.85,1826.83) 1767.85,1858.83
  region net NetBR2_1: 1653.54,1710.79 1345.85,1710.79 1345.85,1827.11 cw(c1377.85,1827.11) 1377.85,1859.11 1625.39,1859.11 cw(c1625.39,1830.96) 1653.54,1830.96
  region net NetBR1_1: 1233.31,1861 cw(c1233.31,1830.77) 1263.54,1830.77 1263.54,1712.68 882.41,1712.68 537,1712.68 537,1829 cw(c569,1829) 569,1861
  region net NetC82_2: 1263.54,1936.73 1263.54,2137.88 ccw(c1229.42,2137.88) 1229.42,2172 572.76,2172 ccw(c572.76,2136.24) 537,2136.24 537,1936 ccw(c569,1936) 569,1904 1230.81,1904 ccw(c1230.81,1936.73)
  region net NetC100_2: 1736.46,1946.73 1736.46,2151.12 cw(c1767.33,2151.12) 1767.33,2182 2431.26,2182 cw(c2431.26,2150.26) 2463,2150.26 2463,1946 cw(c2431,1946) 2431,1914 1769.19,1914 cw(c1769.19,1946.73)
  region net V-OR: 4511.88,897.17 ccw(c4524.05,897.17) 4524.05,885 4564.52,885 cw(c4564.52,869.68) 4579.84,869.68 4579.84,639.84 cw(c4560,639.84) 4560,620 4472.5,620 cw(c4472.5,642.5) 4450,642.5 4450,934.5 cw(c4456.83,934.51) 4456.83,941.33 4478.84,941.33 ccw(c4478.84,949.47) 4486.98,949.47 4486.98,987.17 4511.88,987.17
  region net 3V3: 4476.77,1083.11 cw(c4476.77,1075.65) 4484.23,1075.65 4484.23,1055.28 4517.38,1055.28 ccw(c4517.38,1064.9) 4527,1064.9 4527,1122.08 ccw(c4516.49,1122.08) 4516.49,1132.59 4380.59,1132.59 ccw(c4380.59,1120.18) 4368.18,1120.18 4368.18,1065.9 ccw(c4378.81,1065.9) 4378.81,1055.28 4412.32,1055.28 4412.32,1076.33 cw(c4419.1,1076.33) 4419.1,1083.11
  region net NetL6_1: 4528,996.22 cw(c4528,986.22) 4538,986.22 4538,930.05 4539.83,925.64 4543.2,922.27 4547.61,920.44 4676.83,920.44 4680.2,921.84 4682.78,924.42 4684.18,927.8 4684.18,1000.13 4682.91,1003.22 4680.55,1005.57 4677.46,1006.85 4495.35,1006.85 4495.35,996.22
  region net NetC60_2: 4413.63,1026.54 4324.74,1026.54 ccw(c4324.74,1020.43) 4318.63,1020.43 4318.63,982.09 ccw(c4324.18,982.09) 4324.18,976.54 4413.63,976.54
  region net NetC72_1: 4216.26,512.06 4075.72,512.06 ccw(c4075.72,499.33) 4062.99,499.33 4062.99,392.59 ccw(c4077.38,392.59) 4077.38,378.2 4216.2,378.2 ccw(c4216.2,392) 4230,392 4230,498.32 ccw(c4216.26,498.32)
  pour cut-out: 5280.9,2510.88 5280.9,2576.81 5321.9,2576.81 5321.9,2510.88
  pour cut-out: 4357.6,120 4357.6,142.33 4398.6,142.33 4398.6,120
  region net NetL6_2: 4680.2,1120.6 4682.78,1118.02 4684.18,1114.64 4684.18,1112.82 4684.18,1043.98 4684.18,1042.31 4682.91,1039.23 4680.55,1036.87 4677.46,1035.59 4495.35,1035.59 4495.35,1046.22 4528,1046.22 4529.95,1046.41 4533.56,1047.91 4536.31,1050.66 4537.81,1054.27 4538,1056.22 4538,1110 4538,1112.39 4539.83,1116.8 4543.2,1120.17 4547.61,1122 4676.83,1122
Multi-Layer:
  pour cut-out: 1458.03,2622 ccw(c1523,2622) 1523,2557.03 ccw(c1523,2622) 1587.97,2622 ccw(c1523,2622) 1523,2686.97 ccw(c1523,2622)
  pour cut-out: 1290.03,2459 ccw(c1355,2459) 1355,2394.03 ccw(c1355,2459) 1419.97,2459 ccw(c1355,2459) 1355,2523.97 ccw(c1355,2459)
  pour cut-out: 149.03,2772 ccw(c214,2772) 214,2707.03 ccw(c214,2772) 278.97,2772 ccw(c214,2772) 214,2836.97 ccw(c214,2772)
  pour cut-out: -14.97,2772.43 ccw(c50,2772.43) 50,2707.46 ccw(c50,2772.43) 114.97,2772.43 ccw(c50,2772.43) 50,2837.39 ccw(c50,2772.43)
  pour cut-out: 1978.97,1659 ccw(c2043.94,1659) 2043.94,1594.03 ccw(c2043.94,1659) 2108.9,1659 ccw(c2043.94,1659) 2043.94,1723.97 ccw(c2043.94,1659)
  pour cut-out: 1360.82,1659 ccw(c1425.79,1659) 1425.79,1594.03 ccw(c1425.79,1659) 1490.75,1659 ccw(c1425.79,1659) 1425.79,1723.97 ccw(c1425.79,1659)
  pour cut-out: 5292.88,160.41 ccw(c5292.88,19.68) 5152.16,19.68 ccw(c5292.88,19.68) 5292.88,-121.04 ccw(c5292.88,19.68) 5433.61,19.68 ccw(c5292.88,19.68)
  pour cut-out: 236.39,19.32 ccw(c95.67,19.32) 95.67,160.05 ccw(c95.67,19.32) -45.06,19.32 ccw(c95.67,19.32) 95.67,-121.4 ccw(c95.67,19.32)
  pour cut-out: 95.31,3501.01 ccw(c95.31,3641.74) 236.03,3641.74 ccw(c95.31,3641.74) 95.31,3782.46 ccw(c95.31,3641.74) -45.42,3641.74 ccw(c95.31,3641.74)
  pour cut-out: 5151.8,3642.09 ccw(c5292.52,3642.09) 5292.52,3501.37 ccw(c5292.52,3642.09) 5433.25,3642.09 ccw(c5292.52,3642.09) 5292.52,3782.82 ccw(c5292.52,3642.09)
  pour cut-out: 5194.1,1764 5194.1,2066 5450,2066 5450,1764

## Silkscreen, mask and mechanical layers (free items; w line width, h text height)
Top Overlay:
  drawing of 82 lines, arcs and shapes, not listed
  text "L1- 200-CT1" at 605.41,3685.86 h30
  text "PIN-01" at 297.47,3672.02 h70
  text "L1- 200-CT2" at 605.41,3612.27 h30
  text "PIN-02" at 297.47,3598.43 h70
  text "L1-1000-CT1" at 605.41,3538.67 h30
  text "PIN-03" at 297.47,3524.83 h70
  text "PIN-12" at 1262.9,3491.34 h70
  text "PIN-1" at 3884.33,3481.34 h70
  text "L1-1000-CT2" at 605.41,3465.07 h30
  text "PIN-04" at 297.47,3451.23 h70
  text "L2- 200-CT1" at 605.41,3391.48 h30
  text "PIN-05" at 297.47,3377.64 h70
  text "L2- 200-CT2" at 605.41,3317.88 h30
  text "PIN-06" at 297.47,3304.04 h70
  text "L2-1000-CT1" at 605.41,3244.28 h30
  text "PIN-07" at 297.47,3230.44 h70
  text "L2-1000-CT2" at 605.41,3170.69 h30
  text "PIN-08" at 297.47,3156.85 h70
  text "DCI-P" at 4151.88,3101.66 h70
  text "DCI-N" at 4816.79,3101.66 h70
  text "L3- 200-CT1" at 605.41,3097.09 h30
  text "PIN-09" at 297.47,3083.25 h70
  text "L3- 200-CT2" at 605.41,3023.49 h30
  text "PIN-10" at 297.47,3009.65 h70
  text "L3-1000-CT1" at 605.41,2949.9 h30
  text "PIN-11" at 297.47,2936.35 h70
  text "L3-1000-CT2" at 605.41,2876.3 h30
  text "PIN-12" at 297.47,2862.75 h70
  text "PROG" at 4718.61,2370.66 h70
  text "CAUTION" at 69.9,1791.88 h120
  text "CF4" at 3423.85,1776.18 h70
  text "ANTENNA" at 5180.27,1764 h70 r90
  text "CF3" at 3423.85,1696.76 h70
  text "HIGH VOLTAGE" at -32.43,1690.15 h120
  text "IRQ1" at 3423.85,1615.66 h70
  text "IRQ0" at 3433.85,1550.2 h70
  text "USB" at 5195.57,1293.46 h70
  text "GND" at 5233.61,531.34 h50 r90
  text "INPUT" at 5126.34,408 h70 r90
  text "V-BAT" at 5235.03,216.34 h50 r90
  text "VA" at 1317.48,117.24 h70
  text "VB" at 1518.62,117.24 h70
  text "VC" at 1718.39,117.24 h70
  text "N" at 1939.09,117.24 h70
  text "IA-P" at 2304.07,117.24 h70
  text "IA-N" at 2502.06,117.24 h70
  text "IB-P" at 2704.07,117.24 h70
  text "IB-N" at 2902.06,117.24 h70
  text "IC-P" at 3104.07,117.24 h70
  text "IC-N" at 3302.06,117.24 h70
  text "DC-P" at 3694.25,117.24 h70
  text "DC-N" at 3892.24,117.24 h70
  text "AC INPUT" at 790.95,-3.77 h70
  text "CHG" at 4269,-23.66 h70
  text "POD_v1.0" at 4680,-80.84 h55
  text "FULL" at 4277.44,-86.3 h70
Bottom Overlay:
  drawing of 2 lines, arcs and shapes, not listed
  text "CAUTION" at 2015.55,849.91 h120
  text "HIGH VOLTAGE" at 2117.88,748.19 h120
Dimension:
  drawing of 295 lines, arcs and shapes, not listed
  text "Layer" at 6510.58,4420 h60
  text "Name" at 6920.49,4420 h60
  text "Material" at 7850.23,4420 h60
  text "Thickness" at 8710,4420 h60
  text "Constant" at 9359.84,4420 h60
  text "Board Layer Stack" at 9929.7,4420 h60
  text "Top Overlay" at 6920.49,4300 h60
  text "Top Solder" at 6920.49,4180 h60
  text "Solder Resist" at 7850.23,4180 h60
  text "0.010mm" at 8710,4180 h60
  text "3.5" at 9359.84,4180 h60
  text "1" at 6510.58,4060 h60
  text "Top Layer" at 6920.49,4060 h60
  text "0.035mm" at 8710,4060 h60
  text "Dielectric 2" at 6920.49,3940 h60
  text "PP-006" at 7850.23,3940 h60
  text "0.203mm" at 8710,3940 h60
  text "4.4" at 9359.84,3940 h60
  text "2" at 6510.58,3820 h60
  text "Layer 1" at 6920.49,3820 h60
  text "CF-004" at 7850.23,3820 h60
  text "0.030mm" at 8710,3820 h60
  text "Dielectric 1" at 6920.49,3700 h60
  text "FR-4" at 7850.23,3700 h60
  text "1.030mm" at 8710,3700 h60
  text "4.4" at 9359.84,3700 h60
  text "3" at 6510.58,3580 h60
  text "Layer 2" at 6920.49,3580 h60
  text "CF-004" at 7850.23,3580 h60
  text "0.030mm" at 8710,3580 h60
  text "Dielectric 3" at 6920.49,3460 h60
  text "PP-006" at 7850.23,3460 h60
  text "0.203mm" at 8710,3460 h60
  text "4.4" at 9359.84,3460 h60
  text "4" at 6510.58,3340 h60
  text "Bottom Layer" at 6920.49,3340 h60
  text "0.035mm" at 8710,3340 h60
  text "Bottom Solder" at 6920.49,3220 h60
  text "Solder Resist" at 7850.23,3220 h60
  text "0.010mm" at 8710,3220 h60
  text "3.5" at 9359.84,3220 h60
  text "Bottom Overlay" at 6920.49,3100 h60
  text "Total board thickness:" at 6510.58,2980 h60
  text "1.586mm" at 8710,2980 h60
Board Outline:
  the board outline again, w10
Drill Drawing:
  drawing of 151 lines, arcs and shapes, not listed
  text "Symbol" at 372.5,7238.94 h72
  text "Count" at 878.38,7238.94 h72
  text "Hole Size" at 1468.22,7238.94 h72
  text "Plated" at 2587.89,7238.94 h72
  text "Hole Type" at 3093.77,7238.94 h72
  text "Drill Layer Pair" at 3827.57,7238.94 h72
  text "Via/Pad" at 5327.12,7238.94 h72
  text "Pad Shape" at 5916.97,7238.94 h72
  text "Template" at 6662.77,7238.94 h72
  text "Description" at 7862.42,7238.94 h72
  text "Hole Tolerance (+)" at 8716.18,7238.94 h72
  text "Hole Tolerance (-)" at 10049.79,7238.94 h72
  text "2" at 878.38,7088.94 h60
  text "0.600mm (23.62mil)" at 1468.22,7088.94 h60
  text "PTH" at 2587.89,7088.94 h60
  text "Slot" at 3093.77,7088.94 h60
  text "Top Layer - Bottom Layer" at 3827.57,7088.94 h60
  text "Pad" at 5327.12,7088.94 h60
  text "Rounded" at 5916.97,7088.94 h60
  text "r90_170h60_140r45" at 6662.77,7088.94 h60
  text "2" at 878.38,6938.94 h60
  text "0.600mm (23.62mil)" at 1468.22,6938.94 h60
  text "PTH" at 2587.89,6938.94 h60
  text "Slot" at 3093.77,6938.94 h60
  text "Top Layer - Bottom Layer" at 3827.57,6938.94 h60
  text "Pad" at 5327.12,6938.94 h60
  text "Rounded" at 5916.97,6938.94 h60
  text "(Mixed)" at 6662.77,6938.94 h60
  text "2" at 878.38,6788.94 h60
  text "0.620mm (24.41mil)" at 1468.22,6788.94 h60
  text "NPTH" at 2587.89,6788.94 h60
  text "Round" at 3093.77,6788.94 h60
  text "Top Layer - Bottom Layer" at 3827.57,6788.94 h60
  text "Pad" at 5327.12,6788.94 h60
  text "Rounded" at 5916.97,6788.94 h60
  text "c0hn62" at 6662.77,6788.94 h60
  text "3" at 878.38,6638.94 h60
  text "0.991mm (39.02mil)" at 1468.22,6638.94 h60
  text "NPTH" at 2587.89,6638.94 h60
  text "Round" at 3093.77,6638.94 h60
  text "Top Layer - Bottom Layer" at 3827.57,6638.94 h60
  text "Pad" at 5327.12,6638.94 h60
  text "Rounded" at 5916.97,6638.94 h60
  text "c0hn99" at 6662.77,6638.94 h60
  text "4" at 878.38,6488.94 h60
  text "0.900mm (35.43mil)" at 1468.22,6488.94 h60
  text "PTH" at 2587.89,6488.94 h60
  text "Round" at 3093.77,6488.94 h60
  text "Top Layer - Bottom Layer" at 3827.57,6488.94 h60
  text "Pad" at 5327.12,6488.94 h60
  text "(Mixed)" at 5916.97,6488.94 h60
  text "(Mixed)" at 6662.77,6488.94 h60
  text "4" at 878.38,6338.94 h60
  text "2.375mm (93.50mil)" at 1468.22,6338.94 h60
  text "NPTH" at 2587.89,6338.94 h60
  text "Round" at 3093.77,6338.94 h60
  text "Top Layer - Bottom Layer" at 3827.57,6338.94 h60
  text "Pad" at 5327.12,6338.94 h60
  text "Rounded" at 5916.97,6338.94 h60
  text "c0hn238" at 6662.77,6338.94 h60
  text "4" at 878.38,6188.94 h60
  text "3.000mm (118.11mil)" at 1468.22,6188.94 h60
  text "PTH" at 2587.89,6188.94 h60
  text "Round" at 3093.77,6188.94 h60
  text "Top Layer - Bottom Layer" at 3827.57,6188.94 h60
  text "Pad" at 5327.12,6188.94 h60
  text "Rounded" at 5916.97,6188.94 h60
  text "c500h300" at 6662.77,6188.94 h60
  text "6" at 878.38,6038.94 h60
  text "1.200mm (47.24mil)" at 1468.22,6038.94 h60
  text "PTH" at 2587.89,6038.94 h60
  text "Round" at 3093.77,6038.94 h60
  text "Top Layer - Bottom Layer" at 3827.57,6038.94 h60
  text "Pad" at 5327.12,6038.94 h60
  text "Rounded" at 5916.97,6038.94 h60
  text "c200h120m210mx210p0" at 6662.77,6038.94 h60
  text "6" at 878.38,5888.94 h60
  text "2.000mm (78.74mil)" at 1468.22,5888.94 h60
  text "PTH" at 2587.89,5888.94 h60
  text "Round" at 3093.77,5888.94 h60
  text "Top Layer - Bottom Layer" at 3827.57,5888.94 h60
  text "Pad" at 5327.12,5888.94 h60
  text "(Mixed)" at 5916.97,5888.94 h60
  text "(Mixed)" at 6662.77,5888.94 h60
  text "26" at 878.38,5738.94 h60
  text "1.900mm (74.80mil)" at 1468.22,5738.94 h60
  text "PTH" at 2587.89,5738.94 h60
  text "Round" at 3093.77,5738.94 h60
  text "Top Layer - Bottom Layer" at 3827.57,5738.94 h60
  text "Pad" at 5327.12,5738.94 h60
  text "(Mixed)" at 5916.97,5738.94 h60
  text "(Mixed)" at 6662.77,5738.94 h60
  text "31" at 878.38,5588.94 h60
  text "0.150mm (5.91mil)" at 1468.22,5588.94 h60
  text "PTH" at 2587.89,5588.94 h60
  text "Round" at 3093.77,5588.94 h60
  text "Top Layer - Bottom Layer" at 3827.57,5588.94 h60
  text "Via" at 5327.12,5588.94 h60
  text "Rounded" at 5916.97,5588.94 h60
  text "(Mixed)" at 6662.77,5588.94 h60
  text "381" at 878.38,5438.94 h60
  text "0.300mm (11.81mil)" at 1468.22,5438.94 h60
  text "PTH" at 2587.89,5438.94 h60
  text "Round" at 3093.77,5438.94 h60
  text "Top Layer - Bottom Layer" at 3827.57,5438.94 h60
  text "Via" at 5327.12,5438.94 h60
  text "Rounded" at 5916.97,5438.94 h60
  text "v60h30m0mx0" at 6662.77,5438.94 h60
  text "471 Total" at 878.38,5288.94 h60
  text "Slot definitions :" at 372.5,5143.97 h60
  text "Routed Path Length" at 1405.19,5143.97 h60
  text "= Calculated from tool start centre position to tool end centre position." at 2507.86,5143.97 h60
  text "Hole Length" at 1405.19,5043.99 h60
  text "= Routed Path Length + Tool Size = Slot length as defined in the PCB layout" at 2097.99,5043.99 h60

## Dimensions
5450,3679.57 to -61.81,3679.57 on Dimension
5330,3799.57 to 5330,-137.43 on Dimension

## Text inside footprints (layer, text, board x,y; h text height)
BR1: Top Overlay "~" at 1158.61,1425.79 h60 r180; Top Overlay "~" at 1001.14,1425.79 h60 r180
BR2: Top Overlay "~" at 1438.05,1425.79 h60 r180; Top Overlay "~" at 1595.53,1425.79 h60 r180
BR3: Top Overlay "~" at 2213.68,1425.79 h60 r180; Top Overlay "~" at 2056.2,1425.79 h60 r180
J1: Mechanical 13 "PCB Edge" at 5424.06,1038.82 h31.5 r90
U7: Top Overlay "1" at 3853,894 h31.5